# Altium PCB Sampler.PCBDOC (part 4 of 7)
Units mil, origin at the board's own origin, x right, y up, seen from the top; angles counter-clockwise.
Board outline 6299 x 3937 mil, 4 copper layers (Top, GP1(GND), L3, Bot), stack 64.883 mil thick; 567 components, 323 nets, 1698 pads, 817 vias.
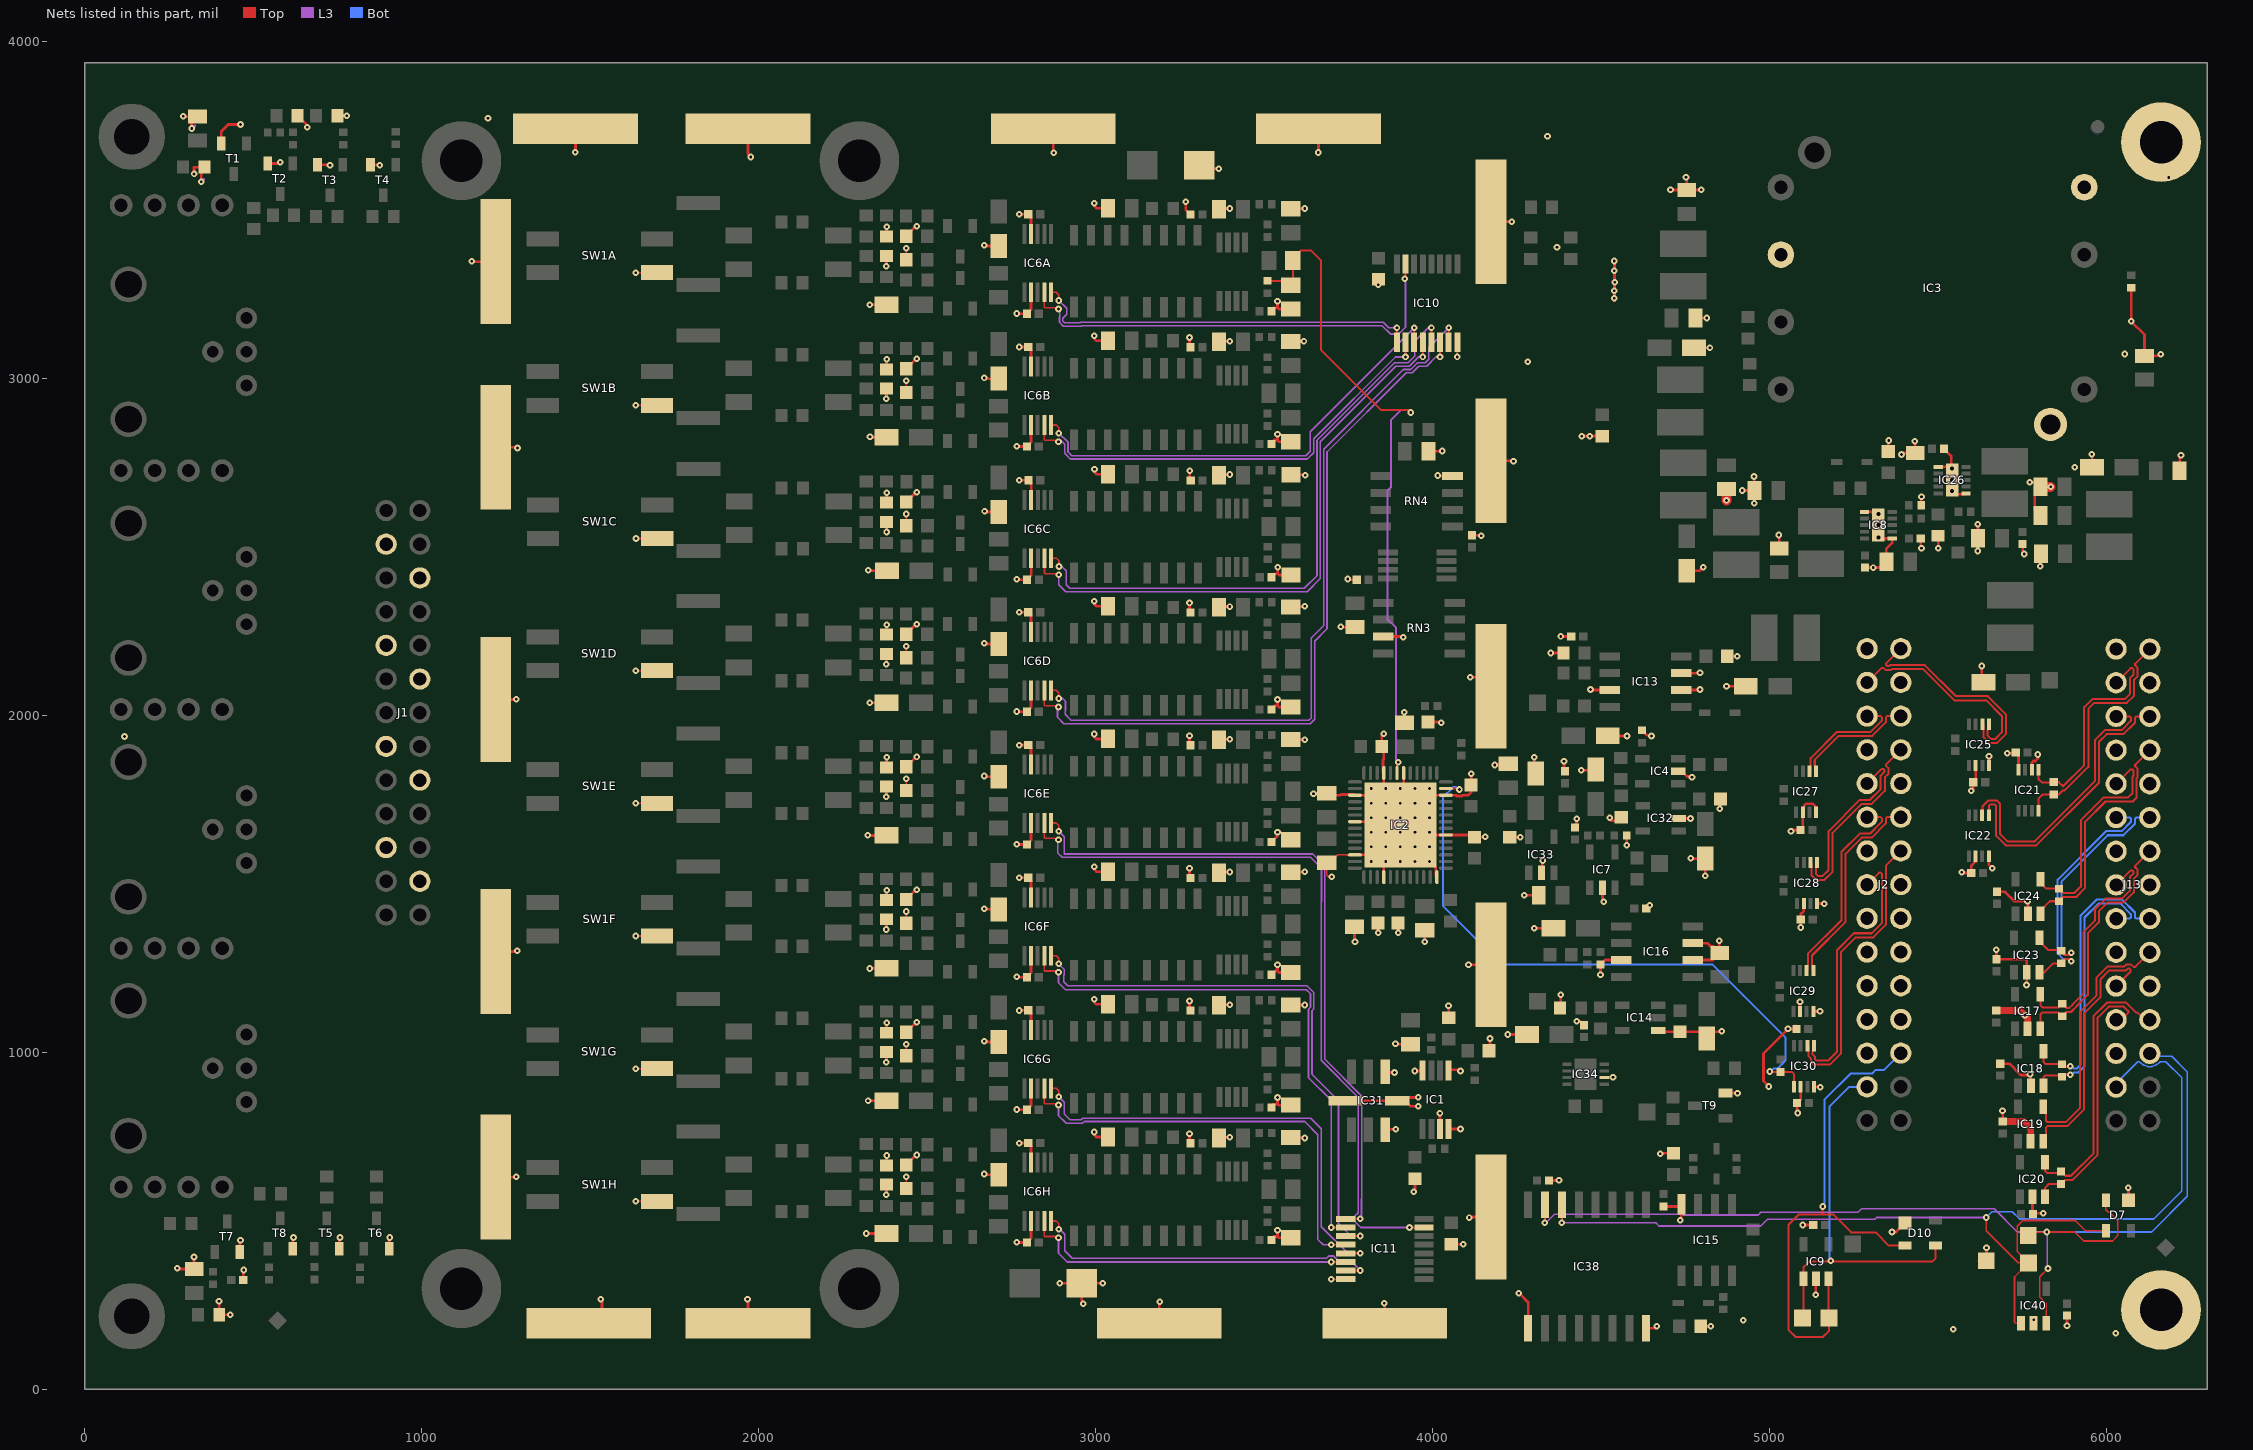
[diagram p5: the nets of this part, all layers, seen from the top]

## Via types
v1: diameter 19.68, hole 7.87, Top to Bot, tented both sides, 772 vias
v2: diameter 23.62, hole 11.81, Top to Bot, tented both sides, 17 vias
v3: diameter 19.68, hole 7.87, Top to Bot, 11 vias
v4: diameter 39.37, hole 23.62, Top to Bot, tented both sides, 7 vias
v5: diameter 23.62, hole 11.81, Top to Bot, 6 vias
v6: diameter 50, hole 28, Top to Bot, 4 vias

## Nets (pads, with @x,y where several pads share a name; then routed paths per layer and width w, separated by ;. In a path a pad name is that pad's centre, name@x,y a point inside that pad or via, vN(x,y) a via of type N, cw(c..) or ccw(c..) an arc to the next point about the centre after c; other vN are vias at no path point) (continued)
ADC_SDOD_P: IC2.39 IC30.1 R47.1 | length 1847.7
  Top w5: v1(5000.47,943.15) v1@5001.69,941.93
  Top w6: IC2.39@4039.17,1782.89 4076.53,1782.89 v1(4079.53,1779.89) ; v1@5001.69,941.93 R47.1@5031.83,941.93 5065.83,941.93 5072.57,935.18 IC30.1@5072.57,897.78
  Bot w6: v1(4079.53,1779.89) 4076.01,1779.89 4069.17,1786.73 4060.69,1786.73 4030.43,1756.48 4030.43,1434.96 4205.23,1260.16 4830.7,1260.16 4921.5,1169.36 5047.68,1043.18 5047.68,977.31 5037.43,967.06 5037.43,966.01 5023.33,951.91 5010.83,951.91 5002.07,943.15 v1(5000.47,943.15)
CH0_A0: IC6A.4 IC10.15 | length 1385.5
  Top w5: IC6A.4@2847.69,3255.39 2847.69,3211.74 2849.65,3209.77 2886.23,3209.77 v1(2890,3206) ; IC10.15@3916.64,3336.24 IC10.15@3919.67,3339.26 3919.67,3298.3 v1(3917.32,3295.95)
  L3 w5: v1(2890,3206) 2893.32,3209.32 2893.32,3183.05 2892.73,3182.46 2892.73,3166.22 2904.22,3154.74 2957.82,3154.74 2959.21,3156.12 3849.78,3156.12 3874.02,3131.89 3894.99,3131.89 3896.12,3133.02 3901.26,3133.02 3919.67,3151.43 3919.67,3298.3 v1(3917.32,3295.95)
CH0_A1: IC6A.5 IC10.1 | length 1163
  Top w5: IC6A.5@2867.37,3255.39 2883.61,3255.39 2891,3248 v1(2891,3231) ; IC10.1@3894.08,3106.98 v1(3894.08,3150.36)
  L3 w5: v1(2891,3231) 2914.37,3207.63 2914.37,3189.96 2902.73,3178.32 2902.73,3170.36 2908.36,3164.74 2953.68,3164.74 2955.07,3166.12 3853.93,3166.12 3869.69,3150.36 v1(3894.08,3150.36)
CH1_A0: IC6B.4 IC10.2 | length 1351.2
  Top w5: IC6B.4@2847.69,2861.69 2847.69,2818.04 2849.65,2816.07 2886.23,2816.07 v1(2890,2812.3) ; v1(3919.67,3063.59) IC10.2@3919.67,3106.98
  L3 w5: v1(2890,2812.3) 2893.32,2815.62 2897.6,2815.62 2908.31,2804.91 2908.31,2777.35 2924.99,2760.67 3628.16,2760.67 3646.81,2779.32 3646.81,2820.4 3890,3063.59 v1(3919.67,3063.59)
CH1_A1: IC6B.5 IC10.3 | length 1377.1
  Top w5: IC6B.5@2867.37,2861.69 2883.61,2861.69 2891,2854.3 v1(2891,2837.3) ; IC10.3@3945.26,3106.98 v1(3945.26,3150.36)
  L3 w5: v1(2891,2837.3) 2918.31,2809.99 2918.31,2781.5 2929.13,2770.67 3624.02,2770.67 3636.81,2783.46 3636.81,2841.92 v1(3945.26,3150.36)
CH2_A0: IC6C.4 IC10.4 | length 1783.1
  Top w5: IC6C.4@2848.18,2466.26 2848.18,2422.61 2850.15,2420.65 2886.72,2420.65 v1(2890.49,2416.87) ; v1(3970.85,3063.59) IC10.4@3970.85,3106.98
  L3 w5: v1@2893.81,2420.19 v1(2890.49,2416.87) 2890.49,2388.05 2911.57,2366.97 3627.8,2366.97 3666.81,2405.98 3666.81,2812.12 3890.94,3036.25 3930.99,3036.25 3959.15,3064.41 3970.03,3064.41 3970.85,3065.22 v1(3970.85,3063.59)
CH2_A1: IC6C.5 IC10.5 | length 1824.5
  Top w5: IC6C.5@2867.86,2466.26 2884.11,2466.26 2891.49,2458.87 v1(2891.49,2441.87) ; IC10.5@3996.44,3106.98 v1(3996.44,3150.36)
  L3 w5: v1(2891.49,2441.87) 2899.66,2441.87 2912.4,2429.13 2912.4,2387.8 2923.23,2376.97 3619.09,2376.97 3656.81,2414.68 3656.81,2816.26 3886.8,3046.25 3926.85,3046.25 3946.85,3066.25 3946.85,3110.24 3986.98,3150.36 v1(3996.44,3150.36)
CH3_A0: IC6D.4 IC10.6 | length 2205.4
  Top w5: IC6D.4@2847.69,2074.28 2847.69,2030.64 2849.65,2028.67 2886.23,2028.67 v1(2890,2024.9) ; v1(4022.03,3063.59) IC10.6@4022.03,3106.98
  L3 w5: v1@2893.32,2028.22 v1(2890,2024.9) 2886.81,2021.71 2886.81,1994.09 2905.67,1975.24 3636.97,1975.24 3649.92,1988.19 3649.92,2219.8 3686.81,2256.69 3686.81,2781.3 3921.76,3016.25 3939.28,3016.25 3959.28,3036.25 3982.17,3036.25 4009.52,3063.59 v1(4022.03,3063.59)
CH3_A1: IC6D.5 IC10.7 | length 2243.4
  Top w5: IC6D.5@2867.37,2074.28 2883.61,2074.28 2891,2066.9 v1(2891,2049.9) ; IC10.7@4047.62,3106.98 v1(4047.62,3150.36)
  L3 w5: v1(2891,2049.9) 2902.86,2049.9 2910.43,2042.32 2910.43,2013.78 2909.45,2012.8 2909.45,2002.95 2927.17,1985.24 3632.83,1985.24 3639.92,1992.33 3639.92,2229.65 3676.81,2266.54 3676.81,2790 3913.06,3026.25 3935.13,3026.25 3955.13,3046.25 3978.03,3046.25 3988.19,3056.41 3988.19,3090.93 v1(4047.62,3150.36)
CH4_A0: IC6E.4 IC11.15 | length 2246.5
  Top w5: IC6E.4@2847.69,1680.58 2847.69,1636.94 2849.65,1634.97 2886.23,1634.97 v1(2890,1631.2) ; v1(3931.21,480.57) IC11.15@3974.6,480.57
  L3 w5: v1@2893.32,1634.52 v1(2890,1631.2) 2887.8,1628.99 2887.8,1591.54 2900.59,1578.74 3637.8,1578.74 3670.28,1546.26 3670.28,1447.13 3669.51,1446.36 3669.51,976.16 3779.53,866.14 3779.53,569.62 3779.21,569.31 3779.21,524.2 3768.36,513.35 3768.36,498.98 3786.76,480.57 v1(3931.21,480.57)
CH4_A1: IC6E.5 IC11.1 | length 2043
  Top w5: IC6E.5@2867.37,1680.58 2883.61,1680.58 2891,1673.2 v1(2891,1656.2) ; IC11.1@3742.31,506.16 v1(3785.7,506.16)
  L3 w5: v1(2891,1656.2) 2907.34,1639.85 2907.34,1589.33 2907.93,1588.74 3644.53,1588.74 3680.28,1552.99 3680.28,1442.99 3679.51,1442.22 3679.51,980.3 3789.53,870.28 3789.53,565.48 3789.21,565.17 3789.21,509.67 v1(3785.7,506.16)
CH5_A0: IC6F.4 IC11.2 | length 1651.6
  Top w5: IC6F.4@2847.69,1286.88 2847.69,1243.23 2849.65,1241.27 2886.23,1241.27 v1(2890,1237.5) ; v1(3698.93,480.57) IC11.2@3742.31,480.57
  L3 w5: v1@2893.32,1240.81 v1(2890,1237.5) 2890,1206.46 2910.43,1186.02 3625,1186.02 3637.42,1173.6 3637.42,1133.56 3631.89,1128.03 3631.89,925.2 3698.93,858.16 v1(3698.93,480.57)
CH5_A1: IC6F.5 IC11.3 | length 1703.7
  Top w5: IC6F.5@2867.37,1286.88 2883.61,1286.88 2891,1279.5 v1(2891,1262.5) ; IC11.3@3742.31,454.98 v1(3785.7,454.98)
  L3 w5: v1(2891,1262.5) 2907.34,1246.15 2907.34,1230.31 2905.51,1228.48 2905.51,1209.65 2917.32,1197.83 3627.33,1197.83 3647.42,1177.74 3647.42,1129.42 3641.89,1123.89 3641.89,934.88 3720.47,856.3 3720.47,492.13 3757.62,454.98 v1(3785.7,454.98)
CH6_A0: IC6G.4 IC11.4 | length 1322.5
  Top w5: IC6G.4@2847.69,893.18 2847.69,849.53 2849.65,847.57 2886.23,847.57 v1(2890,843.8) ; v1(3698.93,429.39) IC11.4@3742.31,429.39
  L3 w5: v1@2893.32,847.11 v1(2890,843.8) 2890,811.77 2912.4,789.37 2960.82,789.37 2966.39,794.94 3620.41,794.94 3659.45,755.91 3659.45,445.01 3675.07,429.39 v1(3698.93,429.39)
CH6_A1: IC6G.5 IC11.5 | length 1369
  Top w5: IC6G.5@2867.37,893.18 2883.61,893.18 2891,885.8 v1(2891,868.8) ; IC11.5@3742.31,403.8 v1(3785.7,403.8)
  L3 w5: v1(2891,868.8) 2907.34,852.45 2907.34,817.07 2924.21,800.2 2957.5,800.2 2962.24,804.94 3637.97,804.94 3669.93,772.99 3669.93,482.92 3749.05,403.8 v1(3785.7,403.8)
CH7_A0: IC6H.4 IC11.6 | length 1002
  Top w5: IC6H.4@2847.69,499.48 2847.69,455.83 2849.65,453.87 2886.23,453.87 v1(2890,450.09) ; v1(3698.93,378.21) IC11.6@3742.31,378.21
  L3 w5: v1@2893.32,453.41 v1(2890,450.09) 2890,404.29 2916.08,378.21 v1(3698.93,378.21)
CH7_A1: IC6H.5 IC11.7 | length 1066.9
  Top w5: IC6H.5@2867.37,499.48 2883.61,499.48 2891,492.09 v1(2891,475.09) ; IC11.7@3742.31,352.62 v1(3785.7,352.62)
  L3 w5: v1(2891,475.09) 2894,475.09 2908.46,460.63 2908.46,411.42 2931.1,388.78 3684.97,388.78 3691.74,395.55 3706.11,395.55 3727.65,374.02 3764.3,374.02 v1(3785.7,352.62)
EEM0_0_N: IC21.1 J13.3 R30.1 | length 671.8
  Top w6: IC21.1@5797.53,1838.75 5797.53,1811.27 5807.62,1801.18 5841.9,1801.18 R30.1@5842.83,1802.11 5858.03,1802.11 5870.53,1789.61 5933.46,1852.54 5933.46,2024.48 5958.2,2049.22 6055.08,2049.22 6069.65,2063.79 6069.65,2111.14 6079.88,2121.37 6079.88,2136.54 6076.37,2140.06 6071.4,2140.06 J13.3@6028.13,2096.79
EEM0_0_P: IC21.8 J13.2 R30.2 | length 710.7
  Top w6: IC21.8@5797.53,1716.7 5797.53,1752.71 5809.93,1765.1 R30.2@5842.83,1765.1 5858.03,1765.1 5870.53,1777.61 5875.51,1777.61 5945.46,1847.57 5945.46,2019.51 5963.17,2037.22 6060.05,2037.22 6081.65,2058.82 6081.65,2106.17 6091.88,2116.4 6091.88,2141.52 6084.85,2148.54 6084.85,2153.52 J13.2@6128.13,2196.79
EEM0_1_N: IC22.5 J13.6 | length 872.7
  Top w6: IC22.5@5650.48,1703.96 5650.48,1731.89 5653.99,1735.41 5668.6,1735.41 5672.11,1731.89 5672.11,1642.56 5700.29,1614.38 5791.65,1614.38 5977.2,1799.93 5977.2,1921.73 5999.76,1944.29 6049.87,1944.29 6084.13,1978.55 6084.13,1993.27 6087.64,1996.79 J13.6@6128.13,1996.79 J13.6@6110.56,1979.22
EEM0_1_P: IC22.6 J13.5 | length 851.4
  Top w6: IC22.6@5630.79,1703.96 5631.3,1704.47 5631.3,1729.69 5649.02,1747.41 5674.17,1747.41 5680.9,1740.68 5684.11,1737.46 5684.11,1647.53 5705.26,1626.38 5786.68,1626.38 5965.2,1804.9 5965.2,1926.71 5994.79,1956.29 6044.9,1956.29 6072.13,1983.52 6072.13,1993.27 6068.61,1996.79 J13.5@6028.13,1996.79
EEM0_2_N: IC24.4 J13.9 R55.1 | length 662.9
  Top w6: IC24.4@5803.75,1502.75 5819.92,1486.58 5857.73,1486.58 R55.1@5858.85,1485.46 5859.63,1485.46 5868.05,1477.05 5868.05,1476.47 5871.57,1472.96 5904.23,1472.96 5923.47,1492.2 5923.47,1688.32 5991.63,1756.48 6063.82,1756.48 6076.63,1769.29 6076.63,1818.12 6079.88,1821.37 6079.88,1836.54 6076.37,1840.06 6071.4,1840.06 J13.9@6028.13,1796.79
EEM0_2_P: IC24.3 J13.8 R55.2 | length 727.2
  Top w6: IC24.3@5803.75,1420.64 5831.56,1448.45 R55.2@5858.85,1448.45 5859.63,1448.45 5868.05,1456.87 5868.05,1457.44 5871.57,1460.96 5909.2,1460.96 5935.47,1487.23 5935.47,1683.35 5996.6,1744.48 6077.71,1744.48 6088.63,1755.4 6088.63,1813.15 6091.88,1816.4 6091.88,1841.52 6084.85,1848.54 6084.85,1853.52 J13.8@6128.13,1896.79
  Bot w6: J13.8@6110.56,1879.22 J13.8@6128.13,1896.79
EEM0_3_N: IC23.4 J13.12 R31.1 | length 707.4
  Top w6: IC23.4@5800.34,1340 5800.34,1330.1 5826,1304.45 5862.29,1304.45 R31.1@5865.29,1301.45 5866.08,1301.45 5874.49,1293.03 5874.49,1290.59 5876.14,1288.94 5886.49,1288.94
  Bot w6: v1(5894.98,1295.29) 5891.28,1295.29 5884.94,1288.94 5876.14,1288.94 5866.46,1298.63 5866.46,1507.74 6003,1644.29 6049.87,1644.29 6084.13,1678.55 6084.13,1693.27 6087.64,1696.79 J13.12@6128.13,1696.79
EEM0_3_P: IC23.3 J13.11 R31.2 | length 716.6
  Top w6: IC23.3@5800.34,1237.64 5815.15,1237.64 5841.95,1264.44 R31.2@5865.29,1264.44 5866.08,1264.44 5874.49,1272.86 5874.49,1275.29 5876.14,1276.94 5886.49,1276.94
  Bot w6: v1(5894.98,1270.6) 5891.28,1270.6 5884.94,1276.94 5871.17,1276.94 5854.46,1293.66 5854.46,1512.72 5998.03,1656.29 6044.9,1656.29 6072.13,1683.52 6072.13,1693.27 6068.61,1696.79 J13.11@6028.13,1696.79
EEM0_4_N: IC17.4 J13.15 R36.1 | length 716.3
  Top w6: IC17.4@5803.03,1173.05 5803.03,1140.28 5810.08,1133.23 5856.87,1133.23 R36.1@5867.97,1144.34 5868.76,1144.34 5877.18,1135.92 5877.18,1135.35 5880.69,1131.83 5889.18,1131.83 5898.89,1141.55 5898.89,1142.52 5931.98,1175.61 5931.98,1357.87 5964.92,1390.81 5964.92,1420.76 5963.17,1422.51 5996.94,1456.29 6044.9,1456.29 6068.62,1480.01 6068.62,1520.31 6079.88,1531.57 6079.88,1536.54 6076.37,1540.06 6071.4,1540.06 J13.15@6028.13,1496.79
EEM0_4_P: IC17.3 J13.14 R36.2 | length 753.3
  Top w6: IC17.3@5803.03,1070.69 5803.03,1112.41 5809.09,1118.47 5856.83,1118.47 R36.2@5867.97,1107.33 5868.76,1107.33 5877.18,1115.75 5877.18,1116.32 5880.69,1119.83 5894.15,1119.83 5910.89,1136.57 5910.89,1137.55 5943.98,1170.64 5943.98,1352.9 5976.92,1385.84 5976.92,1419.3 6001.91,1444.29 6049.87,1444.29 6080.62,1475.04 6080.62,1515.34 6091.88,1526.6 6091.88,1541.52 6084.85,1548.54 6084.85,1553.52 J13.14@6110.56,1579.22
  Bot w6: J13.14@6110.56,1579.22 J13.14@6128.13,1596.79
EEM0_5_N: IC18.4 J13.18 R39.1 | length 854
  Top w6: IC18.4@5812.34,1003.29 5812.34,972.5 5819.92,964.93 5867.25,964.93 R39.1@5867.45,964.73 5873.61,958.57 v1(5892.12,958.57)
  Bot w6: v1(5892.12,958.57) 5895.82,958.57 5902.16,952.23 5910.96,952.23 5922.29,963.56 5922.29,1405.15 5971.32,1454.18 6044.98,1454.18 6084.13,1415.03 6084.13,1400.3 6087.64,1396.79 J13.18@6128.13,1396.79
EEM0_5_P: IC18.3 J13.17 R39.2 | length 828.9
  Top w6: IC18.3@5812.34,900.93 5812.34,925.86 5817.95,931.46 5863.7,931.46 R39.2@5867.45,927.72 5873.61,933.88 v1(5892.12,933.88)
  Bot w6: v1(5892.12,933.88) 5895.82,933.88 5902.16,940.23 5915.93,940.23 5934.29,958.59 5934.29,1400.18 5976.29,1442.18 6040.01,1442.18 6072.13,1410.06 6072.13,1400.3 6068.61,1396.79 J13.17@6028.13,1396.79
EEM0_6_N: IC19.3 J13.21 | length 739.6
  Top w6: IC19.3@5816.64,750.68 5820.71,754.75 5820.71,777.77 5824.23,781.28 5883.63,781.28 5933.46,831.12 5933.46,1115.52 5981.41,1163.47 5981.41,1216.23 6008.34,1243.16 6057.52,1243.16 6062.91,1248.54 6067.88,1248.54 6071.4,1245.03 6071.4,1240.06 J13.21@6028.13,1196.79
EEM0_6_P: IC19.4 J13.20 | length 749.5
  Top w6: IC19.4@5816.64,823.89 5820.71,819.81 5820.71,796.8 5824.23,793.28 5878.66,793.28 5921.46,836.09 5921.46,1120.49 5969.41,1168.44 5969.41,1221.2 6003.36,1255.16 6052.55,1255.16 6057.94,1260.54 6072.85,1260.54 6079.88,1253.52 6084.85,1253.52 J13.20@6128.13,1296.79
EEM0_7_N: IC20.4 J13.24 R40.1 | length 815.2
  Top w6: IC20.4@5817.19,674.19 5817.19,648.76 5823.85,642.09 5869.81,642.09 5873.86,638.04 5873.86,637.47 5877.38,633.95 5894.15,633.95 5961.3,701.1 5961.3,1108.13 6000.95,1147.79 6057.56,1147.79 6087.64,1117.71 6091.78,1117.71 6112.71,1096.79 J13.24@6128.13,1096.79
EEM0_7_P: IC20.3 J13.23 R40.2 | length 790.4
  Top w6: IC20.3@5817.19,571.83 5817.19,598.02 5828.61,609.45 R40.2@5864.66,609.45 5865.45,609.45 5873.86,617.87 5873.86,618.44 5877.38,621.95 5899.12,621.95 5973.3,696.13 5973.3,1103.16 6005.92,1135.79 6051.36,1135.79 6064.47,1122.68 6064.47,1117.71 6043.54,1096.79 J13.23@6028.13,1096.79
EEM1_0_N: IC25.5 J2.3 | length 617.6
  Top w6: J2.3@5289.13,2097.79 5332.4,2141.06 5337.37,2141.06 5344.4,2134.03 5359.31,2134.03 5362.56,2137.28 5455.43,2137.28 5457.5,2135.22 5547.94,2044.78 5642.38,2044.78 5689.13,1998.03 5689.13,1949.43 5670.18,1930.48 5656.28,1930.48 5647.02,1939.74 5647.02,1956.26 5647.96,1957.19 5647.96,1970.6 IC25.5@5650.87,1973.5
EEM1_0_P: IC25.6 J2.2 | length 667.3
  Top w6: J2.2@5389.13,2197.79 5345.85,2154.52 5345.85,2149.54 5349.37,2146.03 5354.34,2146.03 5357.59,2149.28 5460.4,2149.28 5552.91,2056.78 5647.35,2056.78 5701.13,2003 5701.13,1944.46 5675.15,1918.48 5651.31,1918.48 5635.02,1934.77 5635.02,1956.26 5634.09,1957.19 5634.09,1970.6 IC25.6@5631.18,1973.5
EEM1_1_N: IC27.5 J2.6 | length 362.2
  Top w6: IC27.5@5137.7,1843.43 IC27.5@5137.7,1834.21 5134.79,1837.11 5134.79,1850.52 5133.86,1851.46 5133.86,1867.95 5204.88,1938.98 5304.56,1938.98 5345.13,1979.55 5345.13,1994.27 5348.64,1997.79 J2.6@5389.13,1997.79
EEM1_1_P: IC27.6 J2.5 | length 353
  Top w6: IC27.6@5118.01,1834.21 5120.92,1837.11 5120.92,1850.52 5121.86,1851.46 5121.86,1872.92 5199.91,1950.98 5299.58,1950.98 5333.13,1984.52 5333.13,1994.27 5329.61,1997.79 J2.5@5289.13,1997.79
EEM1_2_N: IC28.5 J2.9 | length 537.1
  Top w6: IC28.5@5140.71,1563.54 5137.81,1560.63 5137.81,1547.23 5136.87,1546.29 5136.87,1537.81 5136.87,1529.83 5143.08,1523.62 5157.45,1523.62 5175.07,1541.24 5175.07,1656.56 5267.8,1749.28 5297.89,1749.28 5329.62,1781.01 5329.62,1821.31 5340.88,1832.57 5340.88,1837.54 5337.37,1841.06 5332.4,1841.06 J2.9@5289.13,1797.79
EEM1_2_P: IC28.6 J2.8 | length 595
  Top w6: IC28.6@5121.03,1571.67 IC28.6@5121.03,1563.54 5123.93,1560.63 5123.93,1547.23 5124.87,1546.29 5124.87,1532.84 5124.87,1524.86 5138.1,1511.62 5162.42,1511.62 5187.07,1536.27 5187.07,1651.59 5272.77,1737.28 5302.86,1737.28 5341.62,1776.04 5341.62,1816.34 5352.88,1827.6 5352.88,1842.52 5345.85,1849.54 5345.85,1854.52 J2.8@5389.13,1897.79
EEM1_3_N: IC29.5 J2.12 | length 606.7
  Top w6: IC29.5@5129.47,1243.16 5126.56,1246.06 5126.56,1259.47 5125.62,1260.4 5125.62,1287.46 5225.25,1387.09 5225.25,1589.77 5272.77,1637.28 5302.86,1637.28 5345.13,1679.55 5345.13,1694.27 5348.64,1697.79 J2.12@5389.13,1697.79
EEM1_3_P: IC29.6 J2.11 | length 606.7
  Top w6: IC29.6@5109.78,1243.16 5112.69,1246.06 5112.69,1259.47 5113.62,1260.4 5113.62,1292.43 5213.25,1392.06 5213.25,1594.74 5267.8,1649.28 5297.89,1649.28 5333.13,1684.52 5333.13,1694.27 5329.61,1697.79 J2.11@5289.13,1697.79
EEM1_4_N: IC30.5 J2.15 | length 799.6
  Top w6: IC30.5@5133.52,1017.94 IC30.5@5131.63,1019.83 5128.72,1016.92 5128.72,1003.52 5127.79,1002.58 5127.79,994.1 5134.44,987.44 5134.44,979.05 5137.96,975.54 5173.14,975.54 5199.91,1002.32 5199.91,1303.4 5250.03,1353.52 5302.86,1353.52 5333.13,1383.78 5333.13,1529.79 5329.61,1533.3 5324.64,1533.3 J2.15@5289.13,1497.79
EEM1_4_P: IC30.6 J2.14 | length 868
  Top w6: IC30.6@5111.94,1023.24 IC30.6@5111.94,1019.83 5114.85,1016.92 5114.85,1003.52 5115.79,1002.58 5115.79,989.13 5122.44,982.47 5122.44,970.92 5124.38,968.99 5129.82,963.54 5178.11,963.54 5211.91,997.35 5211.91,1298.43 5255,1341.52 5307.83,1341.52 5345.13,1378.81 5345.13,1553.79 J2.14@5389.13,1597.79
EEM1_5_N: J2.18
EEM1_5_P: J2.17
EEM1_6_N: J2.21
EEM1_6_P: J2.20
EEM1_7_N: J2.24
EEM1_7_P: J2.23
GND: C1.1 C2.1 C3.1 C4.1 C5.1 C6.1 C7.1 C8.1 C9.1 C10A.2 C10B.2 C10C.2 C10D.2 C10E.2 C10F.2 C10G.2 C10H.2 C11A.1 C11B.1 C11C.1 C11D.1 C11E.1 C11F.1 C11G.1 C11H.1 C12.1 C13.1 C14.1 C15.1 C16.1 C18.1 C19.1 C20.1 C21.1 C22.1 C23A.1 C23B.1 C23C.1 C23D.1 C23E.1 C23F.1 C23G.1 C23H.1 C24.1 C25A.2 C25B.2 C25C.2 C25D.2 C25E.2 C25F.2 C25G.2 C25H.2 C26.1 C27.1 C28.2 C29.1 C30.1 C31.1 C32.1 C33.1 C34.1 C35A.1 C35B.1 C35C.1 C35D.1 C35E.1 C35F.1 C35G.1 C35H.1 C36.1 C37.1 C38.1 C39.1 C40.1 C41A.1 C41B.1 C41C.1 C41D.1 C41E.1 C41F.1 C41G.1 C41H.1 C42.1 C43.1 C44.1 C45.1 C46.1 C48.1 C49.2 C50.2 C51.2 C52.1 C53.1 C54.1 C55.1 C56.2 C57.1 C58.1 C59.1 C60.2 C61.1 C62.1 C63.1 C64.1 C66.1 C67.1 C68.1 C69.1 C70A.1 C70B.1 C70C.1 C70D.1 C70E.1 C70F.1 C70G.1 C70H.1 C71A.1 C71B.1 C71C.1 C71D.1 C71E.1 C71F.1 C71G.1 C71H.1 C73A.1 C73B.1 C73C.1 C73D.1 C73E.1 C73F.1 C73G.1 C73H.1 C74A.1 C74B.1 C74C.1 C74D.1 C74E.1 C74F.1 C74G.1 C74H.1 C75.1 C76.1 C77.2 C78.2 C79.2 C80.1 C81.1 C82.1 C85A.1 C85B.1 C85C.1 C85D.1 C85E.1 C85F.1 C85G.1 C85H.1 C88A.1 C88B.1 C88C.1 C88D.1 C88E.1 C88F.1 C88G.1 C88H.1 C94.1 C112.1 C115.2 C117.1 C118.2 C120.1 C121.1 C122.1 C123.1 C153.1 C154.1 C156.1 C157.1 C158.1 C159.1 C160.1 C161.1 C162.1 CLIP6.1 CLIP7.1 CLIP11.1 CLIP12.1 CLIP13.1 CLIP14.1 CLIP15.1 CLIP16.1 CLIP17.1 CLIP18.1 CLIP19.1 CLIP20.1 CLIP21.1 CLIP22.1 CLIP23.1 CLIP24.1 CLIP25.1 CLIP26.1 D7.1 D8.2 D9.1 D10.1 IC1.3 IC1.4 IC1.5 IC1.8 IC2.3 IC2.7 IC2.12 IC2.18 IC2.26 IC2.32 IC2.38 IC2.46 IC2.49 IC2.53 IC3.3 IC3.5 IC3.8 IC4.2 IC6A.2 IC6A.9 IC6B.2 IC6B.9 IC6C.2 IC6C.9 IC6D.2 IC6D.9 IC6E.2 IC6E.9 IC6F.2 IC6F.9 IC6G.2 IC6G.9 IC6H.2 IC6H.9 IC7.2 IC8.1 IC8.6 IC8.11 IC9.2 IC10.8 IC11.8 IC13.3 IC13.6 IC13.7 IC14.1 IC15.4 IC16.3 IC16.6 IC16.7 IC17.2 IC18.2 IC19.2 IC20.2 IC21.2 IC21.4 IC22.2 IC22.4 IC23.2 IC24.2 IC25.2 IC25.4 IC26.1 IC26.6 IC26.11 IC27.2 IC27.4 IC28.2 IC28.4 IC29.2 IC29.4 IC30.2 IC30.4 IC31.3 IC31.4 IC31.5 IC31.8 IC32.2 IC33.2 IC34.6 IC38.1 IC38.8 IC40.2 J1.3 J1.6 J1.9 J1.12 J1.15 J1.18 J1.21 J1.24 J2.1 J2.4 J2.7 J2.10 J2.13 J2.16 J2.19 J2.22 J2.25 J13.1 J13.4 J13.7 J13.10 J13.13 J13.16 J13.19 J13.22 J13.25 pad.0@6161.42,236.22 pad.0@6161.42,3700.79 R8.1 R21.1 R27.1 R28.1 R29.1 R35A.1 R35B.1 R35C.1 R35D.1 R35E.1 R35F.1 R35G.1 R35H.1 R38.1 R43A.1 R43B.1 R43C.1 R43D.1 R43E.1 R43F.1 R43G.1 R43H.1 R48.1 R54.1 R66.2 R67.2 R75.1 R76.1 R143.1 RN3.7 RN4.4 SW1A.3 SW1B.3 SW1C.3 SW1D.3 SW1E.3 SW1F.3 SW1G.3 SW1H.3 T1.2 T2.2 T3.2 T4.2 T5.2 T6.2 T7.2 T8.2 T9.2 TP6.1 | length 17763.2
  Top w5: v1(1635.63,557.86) SW1H.3@1698.5,557.86 ; v1(1635.63,951.57) SW1G.3@1698.5,951.57 ; v1(1635.63,1345.27) SW1F.3@1698.5,1345.27 ; v1(1635.63,1738.97) SW1E.3@1698.5,1738.96 ; v1(1635.63,2132.67) SW1D.3@1698.5,2132.67 ; v1(1635.63,2920.07) SW1B.3@1698.5,2920.07 ; v1(1635.63,3313.77) SW1A.3@1698.5,3313.77 ; v1(1636.12,2524.64) SW1C.3@1699,2524.64 ; C88H.1@2437.72,596.06 v1(2437.72,630.59) ; C88G.1@2437.72,989.76 v1(2437.72,1024.29) ; C88F.1@2437.72,1383.47 v1(2437.72,1417.99) ; C88E.1@2437.72,1777.17 v1(2437.72,1811.69) ; C88D.1@2437.72,2170.87 v1(2437.72,2205.39) ; C88B.1@2437.72,2958.27 v1(2437.72,2992.8) ; C88A.1@2437.72,3351.97 v1(2437.72,3386.5) ; C88C.1@2438.21,2562.84 v1(2438.21,2597.37) ; v1(3698.93,327.03) IC11.8@3742.31,327.03 ; v1(3700.79,1520.67) 3691.93,1520.67 3686.02,1526.57 C14.1@3686.02,1562.46 3694.35,1562.46 3718.59,1586.7 3742.42,1586.7 3743.23,1585.88 3769.33,1585.88 IC2.12@3769.49,1586.04 ; v1(4073.21,3063.59) IC10.8@4073.21,3106.98 ; C28.2@4775.59,3090.55 v1(4822.83,3090.55) ; C27.1@4779.53,3179.13 v1(4812.99,3179.13)
  Top w8: v3(274.61,359.45) 276.77,357.28 C79.2@324.8,357.28 v3(324.8,392.72) ; v3(292.32,3777.56) 293.31,3776.57 C78.2@335.01,3776.57 317.54,3759.1 v3(317.54,3741.22) ; v3(324.88,3606.61) 324.88,3626.06 325.68,3626.86 R75.1@355.31,3626.86 346.47,3618.02 v3(346.47,3583.84) ; v1(399.02,261.81) 399.67,261.16 R76.1@399.67,221.46 v1(432.71,221.46) ; T1.2@405.51,3696.85 405.51,3732.28 426.36,3753.14 v1(462.62,3753.14) ; T7.2@460.63,407.48 460.63,440.95 v1(462.6,442.91) ; C37.1@470.47,324.8 470.47,352.36 v1(472.44,354.33) ; T2.2@543.31,3637.8 576.77,3637.8 v1(580.71,3641.73) ; T8.2@618.11,417.32 618.11,448.82 v1(620.08,450.79) ; R67.2@631.89,3779.53 661.16,3750.26 v1(661.16,3745.29) ; T3.2@690.94,3633.86 726.38,3633.86 v1(728.35,3631.89) ; R66.2@750,3779.53 v1(777.56,3779.53) ; T5.2@755.91,417.32 755.91,448.82 v1(757.87,450.79) ; T4.2@848.42,3633.86 874.02,3633.86 v1(875.98,3631.89) ; T6.2@903.54,417.32 903.54,448.82 v1(905.51,450.79) ; v1(1149,3348) 1150.54,3346.46 CLIP6.1@1220.47,3346.46 ; CLIP7.1@1220.47,629.92 1279.53,629.92 v1(1280.51,630.91) ; CLIP13.1@1220.47,1299.21 1282.48,1299.21 1283.46,1300.2 v1(1283.46,1301.18) ; CLIP14.1@1220.47,2047.25 1280.51,2047.25 1281.5,2048.23 v1(1280.51,2048.23) ; CLIP15.1@1220.47,2795.28 1282.48,2795.28 v1(1284.45,2793.31) ; v1(1455.71,3671.26) 1455.71,3672.8 1452.76,3675.76 1456.69,3679.69 CLIP26.1@1456.69,3740.16 ; v1(1532,268) 1535.43,264.57 CLIP21.1@1535.43,196.85 ; v1(1967,268) 1968.5,266.5 CLIP25.1@1968.5,196.85 ; CLIP16.1@1968.5,3740.16 1968.5,3665.5 v1(1977,3657) ; v1(2318.9,462.6) C11H.1@2379.92,462.6 ; v1(2323.82,1644.69) 2324.8,1643.7 C11E.1@2379.92,1643.7 ; v1(2324.8,856.3) C11G.1@2379.92,856.3 ; v1(2325.79,2430.12) 2326.53,2429.38 C11C.1@2380.41,2429.38 ; v1(2329.72,1249.02) 2330.71,1250 C11F.1@2379.92,1250 ; v1(2329.72,2037.4) C11D.1@2379.92,2037.4 ; v1(2329.72,3218.5) C11A.1@2379.92,3218.5 ; v1(2330.71,2826.77) 2332.68,2824.8 C11B.1@2379.92,2824.8 ; v1(2379.21,577.17) R43H.1@2379.21,607.56 ; R35H.1@2379.21,664.57 v1@2379.21,694.49 ; v1(2379.21,970.87) R43G.1@2379.21,1001.26 ; R35G.1@2379.21,1058.27 v1@2379.21,1088.19 ; v1(2379.21,1364.57) R43F.1@2379.21,1394.96 ; R35F.1@2379.21,1451.97 v1@2379.21,1481.89 ; v1(2379.21,1758.27) R43E.1@2379.21,1788.66 ; R35E.1@2379.21,1845.67 v1@2379.21,1875.59 ; v1(2379.21,2151.97) R43D.1@2379.21,2182.36 ; R35D.1@2379.21,2239.37 v1@2379.21,2269.29 ; v1(2379.21,2939.37) R43B.1@2379.21,2969.76 ; R35B.1@2379.21,3026.77 v1@2379.21,3056.7 ; v1(2379.21,3333.07) R43A.1@2379.21,3363.47 ; R35A.1@2379.21,3420.47 v1@2379.21,3450.4 ; v1(2379.71,2543.95) R43C.1@2379.71,2574.34 ; R35C.1@2379.71,2631.35 v1@2379.71,2661.27 ; C85H.1@2437.72,666.06 v1@2467.24,695.59 ; C85G.1@2437.72,1059.76 v1@2467.24,1089.29 ; C85F.1@2437.72,1453.47 v1@2467.24,1482.99 ; C85E.1@2437.72,1847.17 v1@2467.24,1876.69 ; C85D.1@2437.72,2240.87 v1@2467.24,2270.39 ; C85B.1@2437.72,3028.27 v1@2467.24,3057.79 ; C85A.1@2437.72,3421.97 v1@2467.24,3451.5 ; C85C.1@2438.21,2632.84 v1@2467.74,2662.37 ; v1(2670,639.09) 2672.18,636.91 C10H.2@2712,636.91 ; v1(2670,1032.8) 2672.18,1030.61 C10G.2@2712,1030.61 ; v1(2670,1426.5) 2672.18,1424.31 C10F.2@2712,1424.31 ; v1(2670,1820.2) 2672.18,1818.01 C10E.2@2712,1818.01 ; v1(2670,2213.9) 2672.18,2211.72 C10D.2@2712,2211.72 ; v1(2670,3001.3) 2672.18,2999.12 C10B.2@2712,2999.12 ; v1(2670,3395) 2672.18,3392.82 C10A.2@2712,3392.82 ; v1(2670.49,2605.87) 2672.68,2603.69 C10C.2@2712.49,2603.69 ; v1(2765.94,436.76) 2766.94,435.76 C41H.1@2796.11,435.76 2808.32,447.96 IC6H.2@2808.32,499.48 ; v1(2765.94,830.46) 2766.94,829.46 C41G.1@2796.11,829.46 2808.32,841.66 IC6G.2@2808.32,893.18 ; v1(2765.94,1224.16) 2766.94,1223.16 C41F.1@2796.11,1223.16 2808.32,1235.37 IC6F.2@2808.32,1286.88 ; v1(2765.94,1617.86) 2766.94,1616.86 C41E.1@2796.11,1616.86 2808.32,1629.07 IC6E.2@2808.32,1680.58 ; v1(2765.94,2011.56) 2766.94,2010.56 C41D.1@2796.11,2010.56 2808.32,2022.77 IC6D.2@2808.32,2074.28 ; v1(2765.94,2798.96) 2766.94,2797.96 C41B.1@2796.11,2797.96 2808.32,2810.17 IC6B.2@2808.32,2861.69 ; v1(2765.94,3192.66) 2766.94,3191.66 C41A.1@2796.11,3191.66 2808.32,3203.87 IC6A.2@2808.32,3255.39 ; v1(2766.44,2403.54) 2767.44,2402.54 C41C.1@2796.6,2402.54 2808.81,2414.74 IC6C.2@2808.81,2466.26 ; v1(2772.94,730.76) 2773.22,731.03 C35H.1@2800.05,731.03 2808.32,722.76 IC6H.9@2808.32,672.71 ; v1(2772.94,1124.46) 2773.22,1124.73 C35G.1@2800.05,1124.73 2808.32,1116.46 IC6G.9@2808.32,1066.41 ; v1(2772.94,1518.16) 2773.22,1518.43 C35F.1@2800.05,1518.43 2808.32,1510.16 IC6F.9@2808.32,1460.11 ; v1(2772.94,1911.86) 2773.22,1912.13 C35E.1@2800.05,1912.13 2808.32,1903.87 IC6E.9@2808.32,1853.81 ; v1(2772.94,2305.56) 2773.22,2305.84 C35D.1@2800.05,2305.83 2808.32,2297.57 IC6D.9@2808.32,2247.51 ; v1(2772.94,3092.96) 2773.22,3093.24 C35B.1@2800.05,3093.24 2808.32,3084.97 IC6B.9@2808.32,3034.92 ; v1(2772.94,3486.66) 2773.22,3486.94 C35A.1@2800.05,3486.94 2808.32,3478.67 IC6A.9@2808.32,3428.61 ; v1(2773.44,2697.54) 2773.71,2697.81 C35C.1@2800.54,2697.81 2808.81,2689.54 IC6C.9@2808.81,2639.49 ; CLIP17.1@2874.01,3740.16 2874.01,3670.99 v1(2876,3669) ; v1(2893.7,314.96) D9.1@2958.66,314.96 ; v1(2963.39,254.18) 2958.66,258.91 D9.1@2958.66,314.96 ; v1(2996.06,763.78) 2996.06,754.92 3001.97,749.02 C73H.1@3036.42,749.02 ; v1(2996.06,1157.48) 2996.06,1148.62 3001.97,1142.72 C73G.1@3036.42,1142.72 ; v1(2996.06,1551.18) 2996.06,1542.32 3001.97,1536.42 C73F.1@3036.42,1536.42 ; v1(2996.06,1944.88) 2996.06,1936.02 3001.97,1930.12 C73E.1@3036.42,1930.12 ; v1(2996.06,2338.58) 2996.06,2329.72 3001.97,2323.82 C73D.1@3036.42,2323.82 ; v1(2996.06,3125.98) 2996.06,3117.13 3001.97,3111.22 C73B.1@3036.42,3111.22 ; v1(2996.06,3519.68) 2996.06,3510.83 3001.97,3504.92 C73A.1@3036.42,3504.92 ; v1(2996.56,2730.56) 2996.56,2721.7 3002.46,2715.8 C73C.1@3036.91,2715.8 ; v1(3020.67,314.96) D9.1@2958.66,314.96 ; CLIP24.1@3188.97,196.85 3188.97,258.86 v1(3189.96,259.84) ; v1(3267.71,3523.61) 3267.71,3500.01 C70A.1@3281.5,3486.22 ; v1(3278.54,758.86) 3278.54,733.27 C70H.1@3281.5,730.31 ; v1(3278.54,1152.56) 3278.54,1126.97 C70G.1@3281.5,1124.02 ; v1(3278.54,1546.26) 3278.54,1520.67 C70F.1@3281.5,1517.72 ; v1(3278.54,1939.96) 3278.54,1914.37 C70E.1@3281.5,1911.42 ; v1(3278.54,2333.66) 3278.54,2308.07 C70D.1@3281.5,2305.12 ; v1(3278.54,3121.06) 3278.54,3095.47 C70B.1@3281.5,3092.52 ; v1(3279.04,2725.64) 3279.04,2700.05 C70C.1@3281.99,2697.1 ; D8.2@3303.15,3622.05 v1(3364.91,3622.05) ; C74H.1@3366.14,746.06 3368.11,748.03 v1(3397.64,748.03) ; C74G.1@3366.14,1139.76 3368.11,1141.73 v1(3397.64,1141.73) ; C74F.1@3366.14,1533.46 3368.11,1535.43 v1(3397.64,1535.43) ; C74E.1@3366.14,1927.17 3368.11,1929.13 v1(3397.64,1929.13) ; C74D.1@3366.14,2320.87 3368.11,2322.83 v1(3397.64,2322.83) ; C74B.1@3366.14,3108.27 3368.11,3110.24 v1(3397.64,3110.24) ; C74A.1@3366.14,3501.97 3368.11,3503.94 v1(3397.64,3503.94) ; C74C.1@3366.64,2712.84 3368.6,2714.81 v1(3398.13,2714.81) ; C71H.1@3521.65,442.91 3524.61,445.87 3524.61,450.79 3527.61,453.79 3539.73,453.79 ; C71G.1@3521.65,836.61 3525.59,840.55 3525.59,846.46 3538.7,846.46 3539.73,847.49 ; C71F.1@3521.65,1230.31 3536.13,1244.79 3539.73,1241.19 ; C71D.1@3521.65,2017.72 3530.51,2026.57 3530.51,2028.54 3530.56,2028.59 3539.73,2028.59 ; C71B.1@3521.65,2805.12 3529.53,2812.99 3529.53,2816.93 3538.8,2816.93 3539.73,2815.99 ; C71A.1@3521.65,3198.82 3528.54,3205.71 3528.54,3208.66 3529.57,3209.69 3539.73,3209.69 ; C71C.1@3522.15,2409.69 3533.02,2420.57 3540.23,2420.57 ; v1@3537.91,1653.02 3537.91,1640.27 C71E.1@3521.65,1624.02 3522.64,1624.02 3538.56,1639.94 3538.56,1652.37 v1(3539.73,1653.54) 3543.98,1657.79 3570.82,1630.95 C23E.1@3579.1,1630.95 ; v1(3539.73,472.44) 3539.73,453.79 ; v1(3539.73,866.14) 3539.73,847.49 ; v1(3539.73,1259.84) 3539.73,1241.19 ; v1(3539.73,2047.24) 3539.73,2028.59 ; v1(3539.73,2834.65) 3539.73,2815.99 ; v1(3539.73,3228.35) 3539.73,3209.69 ; v1(3540.23,2439.22) 3540.23,2420.57 ; C23H.1@3579.1,449.85 3543.67,449.85 3539.73,453.79 ; C25H.2@3579.1,747.09 3620.03,747.09 v1(3621.06,746.06) ; C23G.1@3579.1,843.55 3543.67,843.55 3539.73,847.49 ; C25G.2@3579.1,1140.8 3620.03,1140.8 v1(3620.08,1140.75) ; C23F.1@3579.1,1237.25 3543.67,1237.25 3539.73,1241.19 ; C25F.2@3579.1,1534.5 3619.14,1534.5 v1(3621.06,1536.42) ; C25E.2@3579.1,1928.2 3619.05,1928.2 v1(3620.08,1927.17) ; C23D.1@3579.1,2024.65 3543.67,2024.65 3539.73,2028.59 ; C25D.2@3579.1,2321.9 3618.16,2321.9 v1(3620.08,2323.82) ; C23B.1@3579.1,2812.06 3543.67,2812.06 3539.73,2815.99 ; C25B.2@3579.1,3109.3 3617.17,3109.3 v1(3618.11,3110.24) ; C23A.1@3579.1,3205.76 3543.67,3205.76 3539.73,3209.69 ; C25A.2@3579.1,3503 3620.13,3503 v1(3621.06,3503.94) ; C23C.1@3579.6,2416.63 3544.16,2416.63 3540.23,2420.57 ; C25C.2@3579.6,2713.87 3620.77,2713.87 v1(3622.05,2712.6) ; v1(3646.65,1767.72) 3647.26,1768.32 C15.1@3686.02,1768.32 3691.14,1763.2 3726.26,1763.2 3728.42,1765.36 3767.33,1765.36 IC2.3@3769.49,1763.2 3815.75,1763.2 IC2.53@3855.12,1723.83 ; v1(3660.43,3670.28) 3661.42,3671.26 CLIP18.1@3661.42,3740.16 ; v1(3727.36,2262.8) 3728.35,2261.81 C76.1@3769.69,2261.81 ; IC31.8@3740.16,856.45 IC31.4@3895.67,856.45 IC31.4@3918.31,856.45 ; v1(3748.03,2404.53) 3750,2402.56 C22.1@3774.61,2402.56 ; C6.1@3768.17,1373.12 3768.17,1330.26 v1(3769.69,1328.74) ; IC2.12@3769.49,1586.04 3815.75,1586.04 IC2.53@3855.12,1625.41 ; IC2.7@3769.49,1684.46 IC2.53@3894.49,1684.46 ; C94.1@3835.23,3297.4 C94.1@3838.57,3294.05 ; v1(3838.17,1354.53) C54.1@3838.17,1384.06 ; v1(3838.57,3277.55) C94.1@3838.57,3294.05 ; C94.1@3839.08,3293.55 C94.1@3838.57,3294.05 ; RN3.7@3853.35,2233.86 3910.83,2233.86 v1(3912.4,2232.28) ; IC2.18@3855.12,1520.09 IC2.53@3855.12,1625.41 ; v1(3855.31,1945.87) 3849.41,1939.96 C5.1@3849.41,1907.48 3855.12,1901.77 3855.12,1871.18 3852.96,1869.03 3852.96,1831.31 IC2.49@3855.12,1829.15 IC2.53@3855.12,1723.83 ; v1(3856.3,255.91) 3858.27,253.94 CLIP22.1@3858.27,196.85 ; IC31.3@3859.06,769.83 3861.05,771.83 v1(3890.87,771.83) ; IC31.5@3859.06,943.06 3861.83,940.29 v1(3886.95,940.29) ; v1(3889.76,1025.59) 3890.87,1024.48 C12.1@3934.24,1024.48 ; C3.1@3897.17,1384.06 3897.17,1355 v1(3897.64,1354.53) ; IC2.46@3914.17,1829.15 IC2.53@3914.17,1684.46 ; C16.1@3916.17,1977.98 v1(3916.17,2009.48) ; v1(3944.39,586.5) 3947.64,589.74 C1.1@3947.64,625.45 ; v1(3946.85,944.93) 3968.59,944.93 IC1.8@3971.96,948.3 ; v1(3957.75,840.55) 3934.2,840.55 IC31.4@3918.31,856.45 ; v1(3957.75,867.27) 3956.71,866.23 3928.09,866.23 IC31.4@3918.31,856.45 ; v1(3976.38,1328.74) C13.1@3976.38,1362.2 ; C4.1@3986.22,1980.31 4023.62,1980.31 v1(4025.59,1978.35) ; C75.1@3988.19,2783.46 4026.57,2783.46 4027.56,2784.45 v1(4028.54,2784.45) ; IC2.26@4012.6,1520.09 4009.5,1523.19 4009.5,1547.8 v1(3990.94,1566.35) v1(3947.64,1609.66) v1(3904.33,1652.97) IC2.53@3904.33,1674.62 ; v1(4014.76,2711.61) 4016.54,2709.84 RN4.4@4059.06,2709.84 ; IC1.3@4021.65,772.64 v1(4021.65,818.9) ; IC1.4@4047.24,772.64 4047.28,772.68 v1(4082.88,772.68) ; IC1.5@4047.24,945.87 4049.67,945.87 4052.1,948.3 4076.35,948.3 4079.71,944.93 v1(4082.88,944.93) ; v1(4047.25,1138.02) 4048.23,1138.99 C2.1@4048.23,1102.36 ; C57.1@4055.12,431.1 v1(4090.55,431.1) ; v1(4106.3,1259.84) CLIP11.1@4173.23,1259.84 ; v1(4108.27,509.84) 4110.24,511.81 CLIP23.1@4173.23,511.81 ; v1(4111.22,2113.19) 4146.66,2113.19 CLIP20.1@4173.23,2086.62 ; v1(4114.17,1826.77) C7.1@4114.17,1793.31 4114.17,1771.65 4105.72,1763.2 4089.49,1763.2 4087.33,1761.05 4071.72,1761.05 4069.57,1763.2 IC2.38@4039.17,1763.2 3992.91,1763.2 IC2.53@3914.17,1684.46 ; C20.1@4117.13,2534.45 4143.7,2534.45 v1(4144.69,2533.46) ; v1(4156.5,1639.76) 4155.51,1638.78 C8.1@4124.02,1638.78 4117.7,1645.09 IC2.32@4039.17,1645.09 3933.86,1645.09 IC2.53@3904.33,1674.62 ; C80.1@4167.32,1005.1 4170.28,1008.05 v1(4170.28,1041.34) ; CLIP12.1@4173.23,2755.91 4238.19,2755.91 v1(4240.16,2753.94) ; CLIP19.1@4173.23,3464.57 v1(4235.24,3464.57) ; v1(4183.83,1852.77) 4221.19,1852.77 C9.1@4224.72,1856.3 ; v1@4222.44,1053.15 C52.1@4279.53,1053.15 ; C82.1@4228.97,1637.8 4229.96,1638.78 v1(4259.76,1638.78) ; v1(4255.91,285.43) 4283.66,257.68 IC38.1@4283.66,181.1 ; v1(4271.65,1466.54) C53.1@4314.96,1466.54 ; v1(4301.18,1368.11) C115.2@4358.27,1368.11 ; v1(4301.42,1875.98) 4301.42,1831.94 C56.2@4306.02,1827.34 ; IC33.2@4322.83,1533.55 4324.91,1535.63 4324.91,1567.28 v1(4326.99,1569.35) ; C153.1@4345.47,620.08 4374.02,620.08 v1(4375,621.06) ; v1(4350.39,2185.04) R143.1@4387.8,2185.04 ; R38.1@4377.95,1131.89 4379.92,1133.86 v1(4379.92,1171.26) ; v1(4379.92,2234.25) C30.1@4411.42,2234.25 ; v1(4389.76,1863.93) 4389.76,1837.09 C45.1@4392.8,1834.06 ; C55.1@4422.32,1667 4427.16,1671.84 v1(4427.16,1693.56) ; v1(4427.16,1092.52) 4437.01,1092.52 C46.1@4448.82,1080.71 ; v1(4440.94,1837.54) 4481.39,1837.54 C118.2@4483.5,1839.66 ; v1@4441.93,2829.72 v1(4442.91,2828.74) C29.1@4502.95,2828.74 ; v1(4468.5,2076.77) 4469.9,2075.37 IC13.3@4525.55,2075.37 ; v1(4498.03,1230.31) R29.1@4498.03,1261.02 4511.22,1274.21 IC16.3@4559.06,1274.21 ; IC7.2@4503.96,1488.16 4503.96,1450.77 v1(4507.87,1446.85) ; IC34.6@4508.86,925.34 4509.22,925.71 4535,925.71 v1(4535.36,926.07) ; C51.2@4519.69,1938.98 v1(4576.77,1938.98) ; v1(4525.78,1696.28) 4525.78,1693.11 4530.55,1688.34 4530.55,1687.7 4549.41,1687.7 C81.1@4559.96,1698.25 ; v1@4539.37,3230.31 v1(4539.37,3237.2) v1(4539.37,3259.84) v1(4539.37,3318.9) v1(4539.37,3348.43) v1@4542.32,3351.38 ; v1(4575.59,1614.17) R54.1@4575.59,1643.7 ; R27.1@4621.06,1955.96 4621.85,1955.96 4629.27,1948.54 4629.27,1947.76 4636.35,1940.68 4647.83,1940.68 v1(4649.53,1938.98) ; IC38.8@4633.66,181.1 4659.45,181.1 v1(4665.35,187.01) ; C62.1@4633.86,1427.17 4643.77,1437.08 v1(4643.93,1437.08) ; IC14.1@4669.29,1064.96 4673.23,1061.02 C44.1@4734.25,1061.02 4856.3,1061.02 v1(4858.27,1062.99) ; v1(4675.2,698.82) 4677.17,700.79 C68.1@4714.57,700.79 ; R48.1@4685.04,542.52 4731.3,542.52 IC15.4@4737.99,549.21 4737.99,505.71 v1(4734.25,501.97) ; v1(4705.71,3560.04) 4706.69,3559.06 C26.1@4753.94,3559.06 ; IC4.2@4728.35,1834.21 4739.17,1834.21 4754.8,1818.58 4767.45,1818.58 v1(4769.69,1816.34) ; IC32.2@4730.32,1694.27 4765.05,1694.27 v1(4765.2,1694.12) ; IC13.6@4738.15,2075.37 4791.91,2075.37 v1(4793.31,2076.77) ; IC13.7@4738.15,2125.37 4792.7,2125.37 v1(4793.31,2125.98) ; v1(4751.97,3596.46) 4753.94,3594.49 C26.1@4753.94,3559.06 ; C18.1@4753.94,2429.13 4792.32,2429.13 v1(4803.15,2439.96) ; v1(4765.75,1575.79) 4766.73,1574.8 C77.2@4809.06,1574.8 v1(4809.06,1523.62) ; IC16.6@4771.65,1274.21 4831.3,1274.21 C61.1@4852.36,1295.28 C61.1@4847.44,1300.2 ; IC16.7@4771.65,1324.21 4815.55,1324.21 4824.8,1314.96 4832.68,1314.96 C61.1@4847.44,1300.2 ; C66.1@4795.28,187.01 v1(4824.8,187.01) ; v1(4797.24,3560.04) 4796.26,3559.06 C26.1@4753.94,3559.06 ; v1(4850.39,1331.69) 4850.39,1303.15 C61.1@4847.44,1300.2 ; v1(4852.36,1722.44) 4854.33,1724.41 C117.1@4854.33,1751.97 ; T9.2@4869.48,879.41 4904.06,879.41 v1(4904.53,878.94) ; v1(4872.05,2086.61) C60.2@4929.13,2086.61 ; C112.1@4874.02,2175.2 v1(4903.54,2175.2) ; v1(4918.31,2667.32) C40.1@4954.72,2667.32 ; v1(4953.74,2708.66) 4954.72,2707.68 C40.1@4954.72,2667.32 ; v1(4954.72,2629.92) C40.1@4954.72,2667.32 ; v1(4997.77,898.77) 4981.63,914.91 4981.63,996.9 5051.66,1066.93 5064.81,1066.93 5073.5,1075.62 5074.16,1075.62 5076.5,1077.96 C21.1@5076.5,1078.98 ; v1(5027.23,2535.03) 5028.21,2534.05 C59.1@5028.21,2495.66 ; v1(5054.66,1069.93) 5054.83,1069.76 C21.1@5079.37,1069.76 ; v1(5063.29,1656.26) 5066.85,1659.81 C38.1@5091.97,1659.81 5098.33,1666.17 IC27.2@5098.33,1712.16 ; v1(5083.4,820.03) 5081.12,822.31 C31.1@5081.12,849.43 5092.26,860.57 IC30.2@5092.26,897.78 ; IC29.2@5090.1,1121.11 v1(5090.1,1150.64) ; v1(5092.18,1370.54) C24.1@5092.18,1394.14 5092.18,1409.91 5101.34,1419.07 IC28.2@5101.34,1441.49 ; IC27.2@5096.42,1712.16 5100.23,1715.97 5100.23,1727.32 5103.11,1730.2 5103.11,1732.62 5108.38,1737.89 5127.65,1737.89 5135.79,1729.75 5135.79,1714.07 IC27.4@5137.7,1712.16 ; v1(5097.89,487.63) C43.1@5129.39,487.63 ; IC29.4@5129.47,1131.94 IC29.4@5129.47,1121.11 5148.41,1121.11 v1(5149.34,1122.05) ; IC30.4@5131.63,897.78 5149.34,897.78 v1(5150.33,896.8) ; v1(5137.26,280.94) IC9.2@5137.26,328.18 ; IC28.4@5140.71,1441.49 v1(5162.37,1441.49) ; IC8.6@5281.37,2603.93 5303.02,2603.93 5322.71,2584.25 v5(5322.71,2564.56) 5322.71,2541.92 5342.39,2522.24 5345.35,2525.19 IC8.1@5364.05,2525.19 5364.05,2512.39 5346.33,2494.68 C64.1@5346.33,2456.29 5339.44,2449.4 5339.44,2438.58 v1(5307.94,2438.58) C58.1@5283.34,2438.58 ; C69.1@5352.24,2783.06 5352.24,2814.56 v1(5353.22,2815.54) ; v1(5362.9,466.9) 5375.38,466.9 D10.1@5401.93,493.44 ; v1(5391.11,2774.02) 5395.66,2778.56 C123.1@5431.69,2778.56 5431.69,2812.18 v1(5430.48,2813.39) ; C63.1@5448.69,2525.19 5448.69,2497.63 v1(5450.66,2495.66) ; R28.1@5449.48,2623.61 5449.48,2647.04 v1(5450.66,2648.22) ; v1(5499.87,2495.66) R21.1@5499.87,2533.06 ; IC26.1@5499.94,2737.58 5526.77,2737.58 IC26.11@5541.27,2723.08 ; C122.1@5517.59,2790.94 5538.62,2769.91 5538.62,2735.03 v5(5541.27,2732.37) v5(5541.27,2698.21) ; v5(5541.27,2665.75) 5551.12,2655.91 5579.68,2655.91 IC26.6@5582.61,2658.84 ; v1(5570.25,1534.79) 5572.83,1532.21 C160.1@5598.02,1532.21 5598.02,1552.72 5611.11,1565.81 IC22.2@5611.11,1581.91 ; v1(5598.33,1776.42) 5604.16,1782.24 C33.1@5604.16,1801.65 5611.5,1808.99 IC25.2@5611.5,1851.46 ; v1(5617.49,2487.73) 5618.26,2488.49 C121.1@5618.26,2525.13 5618.26,2566.56 v1(5617.49,2567.32) ; TP6.1@5620.04,381.33 5643.66,381.33 v1(5643.66,420.28) ; v1(5629.31,2146.59) 5629.31,2103.34 C50.2@5634.86,2097.79 ; IC22.4@5650.48,1581.91 5650.48,1556.4 v1(5660.8,1546.07) ; v1(5672.37,1304.67) 5673.41,1303.63 C67.1@5673.41,1276.44 5759.48,1276.44 5762.94,1272.98 IC23.2@5762.94,1237.64 5762.94,1200.45 v1(5762.3,1199.8) ; C154.1@5674.7,1476.38 5698.32,1476.38 5725.88,1448.82 v1(5765.25,1448.82) 5766.34,1447.72 IC24.2@5766.34,1411.82 ; C158.1@5684.54,966.54 5711.3,966.54 5744.71,933.13 5774.94,933.13 IC18.2@5774.94,900.93 IC18.2@5771.22,897.21 ; v1(5691.07,827.29) 5692,826.36 C157.1@5692,794.98 ; v1(5705.26,1887.8) 5727.78,1887.8 C161.1@5730.04,1890.06 5738.48,1881.61 IC21.4@5738.48,1838.75 ; C120.1@5750.69,2508.41 5750.69,2483.33 v1(5755.29,2478.74) ; v1(5771.75,2691.67) 5789.83,2691.67 C36.1@5803.5,2678 ; IC21.2@5777.85,1838.75 5777.85,1859.7 5782.63,1864.48 5788.25,1864.48 5796.79,1873.03 5796.79,1882.87 v1(5795.81,1883.86) ; IC20.2@5779.78,571.83 5779.78,521.94 C156.1@5781.07,520.66 5783.41,523 v1(5812.04,523) ; IC40.2@5784,198.19 v1(5784,207.05) ; C36.1@5786.83,2675.87 5786.83,2609.67 C39.1@5803.5,2593 ; v1(5803.26,2442.6) 5805.5,2444.84 C48.1@5805.5,2480 ; v1(5882.42,189.34) C162.1@5882.42,218.86 ; v1(5955.87,2774.61) 5956.85,2773.62 C49.2@5956.85,2736.22 ; v3(6064.47,598.02) 6064.67,597.82 D7.1@6064.67,561.55 ; R8.1@6072.83,3268.9 v1(6072.83,3169.28) 6112.2,3129.91 C32.1@6112.2,3066.93 6164.82,3066.93 v1(6160.64,3071.11) ; C34.1@6216.54,2726.38 6216.54,2767.46 v1(6220.47,2771.39) ; IC2.53@3855.12,1625.41 IC2.53@3904.33,1674.62 ; IC2.53@3855.12,1723.83 IC2.53@3894.49,1684.46 ; IC2.53@3894.49,1684.46 IC2.53@3904.33,1674.62 ; IC2.53@3904.33,1674.62 IC2.53@3914.17,1684.46
  Top w10: IC25.4@5650.87,1851.46 v1(5650.87,1878.94)
  Top w20: C159.1@5672.73,1124.02 5743.6,1124.02 v1(5757.87,1109.74) 5765.63,1101.98 IC17.2@5765.63,1070.69 ; C157.1@5692,794.98 5754.72,794.98 5774.5,775.2 IC19.2@5774.5,736.1
  Top w30: v1(4872.05,2637.8) C42.1@4872.05,2671.26 ; C36.1@5803.5,2678 v1(5833.7,2678)
  L3 w8: v3(317.54,3741.22) 319.01,3741.22 326.79,3749 ; v3(346.47,3583.84) v3@353.19,3590.55
  other v1: 6026.84,166.11 5545.23,178.82 4921.75,204.97 2379.78,694.17 2469.21,695.59 5772.67,935.4 4222.44,1053.15 2379.78,1087.87 2469.21,1089.29 2379.78,1481.57 2469.21,1482.99 3817.72,1566.35 3861.02,1566.35 3904.33,1566.35 3947.64,1566.35 3817.72,1609.66 3861.02,1609.66 3904.33,1609.66 3990.94,1609.66 3817.72,1652.97 3861.02,1652.97 3947.64,1652.97 3990.94,1652.97 3817.72,1696.28 3861.02,1696.28 3904.33,1696.28 3947.64,1696.28 3990.94,1696.28 3817.72,1739.58 3861.02,1739.58 3904.33,1739.58 3947.64,1739.58 3990.94,1739.58 3817.72,1782.89 3861.02,1782.89 3904.33,1782.89 3947.64,1782.89 3990.94,1782.89 2379.78,1875.27 2469.21,1876.69 118.6,1937.25 2379.78,2268.97 2469.21,2270.39 2380.28,2660.95 2469.71,2662.37 5905.81,2736.59 4466.54,2828.74 4281.99,3049.46 2379.78,3056.37 2469.21,3057.79 6054,3072.11 4540.35,3285.43 4369.09,3388.78 2379.78,3450.07 2469.21,3451.5 6184,3596.11 4341.04,3718.75 1197,3772
  other v5: 5322.71,2528.14 5322.71,2598.02
I2C0_SCL: D7.3 IC38.14 IC40.1 J13.27 TP2.1 | length 3366.9
  Top w5: v1(4382.87,494.09) 4383.66,494.88 IC38.14@4383.66,547.24 ; v1(5642.68,509.88) 5642.68,471 5738.19,375.49 TP2.1@5756.63,375.49 ; IC40.1@5746,196.45 5729.62,196.45 5726.69,199.38 5726.69,333.73 TP2.1@5768.45,375.49 5734.95,408.99 5734.95,484.59 5751.31,500.95 5907.09,500.95 5937.05,471 D7.3@5997.74,471
  L3 w5: v1(4382.87,494.09) 4662.3,494.09 4671.77,484.63 4973.32,484.63 4993.67,504.97 5312.21,504.97 5317.12,509.88 v1(5642.68,509.88)
  Bot w5: v1(5642.68,509.88) 5660.02,527.23 5719.78,527.23 5741.35,505.66 6139.51,505.66 6222.44,588.58 6222.44,925.63 6175.57,972.5 6158.89,972.5 6157.42,971.04 6157.32,970.93 cw(c6128.13,996.79) 6098.93,970.93 6098.83,971.03 6097.36,972.5 6092.4,972.5 6028.13,908.23 J13.27@6028.13,896.79
I2C0_SDA: D7.2 IC38.15 IC40.3 J13.26 TP1.1 | length 3262.3
  Top w5: v1(4332.68,494.09) 4333.66,495.08 IC38.15@4333.66,547.24 ; TP1.1@5763.51,464.36 5763.51,466.36 v1@5821.89,466.36 ; IC40.3@5820.81,196.45 5820.81,254.74 5801.5,274.05 5801.5,334.23 v1(5826,358.73) ; v1(5821.89,466.9) 5905.57,466.9 5931.98,440.48 6017.12,440.48 6033.13,456.49 6033.13,500.95 6006.72,527.36 6003.36,527.36 5997.74,532.98 D7.2@5997.74,561.55
  L3 w5: v1(4332.68,494.09) 4336.61,494.09 4361.83,519.31 4741.44,519.31 4743.03,517.72 4966.17,517.72 4973.67,525.22 5262.42,525.22 5272.76,535.56 5666.21,535.56 5734.88,466.9 v1(5821.89,466.9) 5823.94,464.84 5823.94,360.79 v1(5826,358.73)
  Bot w5: v1(5821.89,466.9) 6133.41,466.9 6239.17,572.66 6239.17,941.93 6192.91,988.19 6136.72,988.19 J13.26@6128.13,996.79 J13.26@6122.93,991.6
I2C1_SCL: D10.3 IC9.1 J2.27 TP4.1 | length 1185.9
  Top w6: TP4.1@5097.89,212.04 5099.86,214.01 IC9.1@5099.86,328.18 5099.86,361.65 5117.58,379.36 5482.08,379.36 5492.48,389.76 D10.3@5492.48,426.51
  Bot w6: v1(5181.1,381.89) 5178.07,384.92 5178.07,840.11 5235.75,897.79 J2.27@5289.13,897.79
I2C1_SDA: D10.2 IC9.3 J2.26 TP3.1 | length 1628.9
  Top w6: v1(5157.45,542.56) 5156.95,542.06 5156.95,519.13 ; IC9.3@5174.66,328.18 5174.66,214.01 TP3.1@5176.63,212.04 5176.63,174.64 5156.95,154.95 5078.21,154.95 5055.68,177.48 5055.68,487.74 5087.06,519.13 5156.95,519.13 ; D10.2@5401.93,426.51 5354.03,426.51 5314.78,465.75 5241.81,465.75 5188.44,519.13 5156.95,519.13
  Bot w6: v1(5157.45,542.56) v1@5160.07,539.94 ; v1@5162.37,542.56 5162.37,859.33 5240.32,937.28 5304.11,937.28 5314.96,948.13 5339.47,948.13 J2.26@5389.13,997.79
IN_0_N: C17A.2 C23A.2 IC2.47 R14A.2 | length 2010.5
  Top w6: R14A.2@3510.2,3289.22 3566.5,3289.22 C23A.2@3579.1,3276.62 3585.01,3282.53 C17A.2@3585.01,3349.46 3585.01,3356.66 3608.27,3379.92 3638.34,3379.92 3669.29,3348.97 3669.29,3083.66 3847.44,2905.51 3928.2,2905.51 v1(3935.04,2898.67) ; IC2.47@3894.49,1829.15 3894.49,1858.22 v1(3897.49,1861.22)
  L3 w6: v1(3897.49,1861.22) 3890.65,1868.06 3890.65,2261.17 3865.77,2286.04 3865.77,2665.97 3876.17,2676.37 3876.17,2875.98 3905.7,2905.51 3928.2,2905.51 v1(3935.04,2898.67)